# Altium PCB soundbox.PcbDoc
Units mil, origin at the board's own origin, x right, y up, seen from the top; angles counter-clockwise.
Board outline 3320 x 2560 mil, 2 copper layers (Top Layer, Bottom Layer); 39 components, 38 nets, 214 pads, 25 vias.
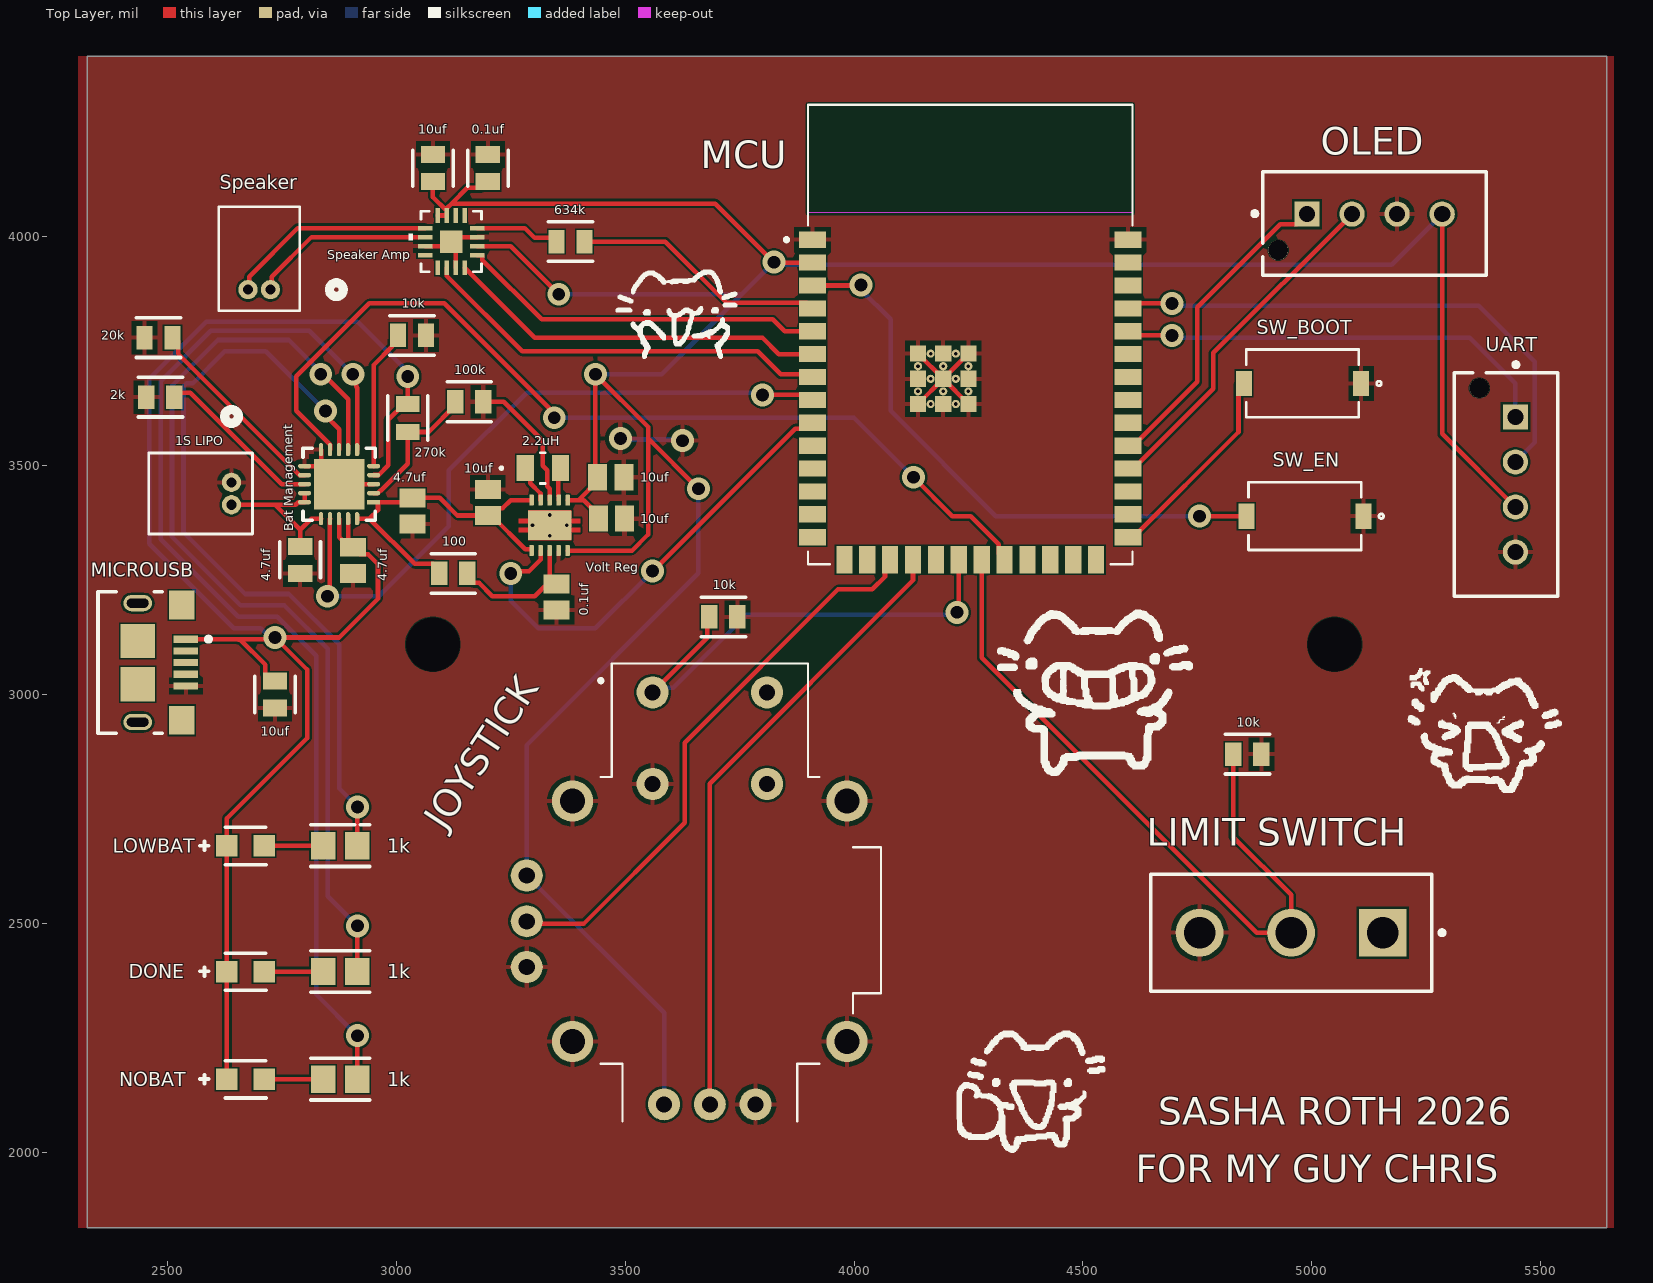
[diagram p0: Top Layer view]
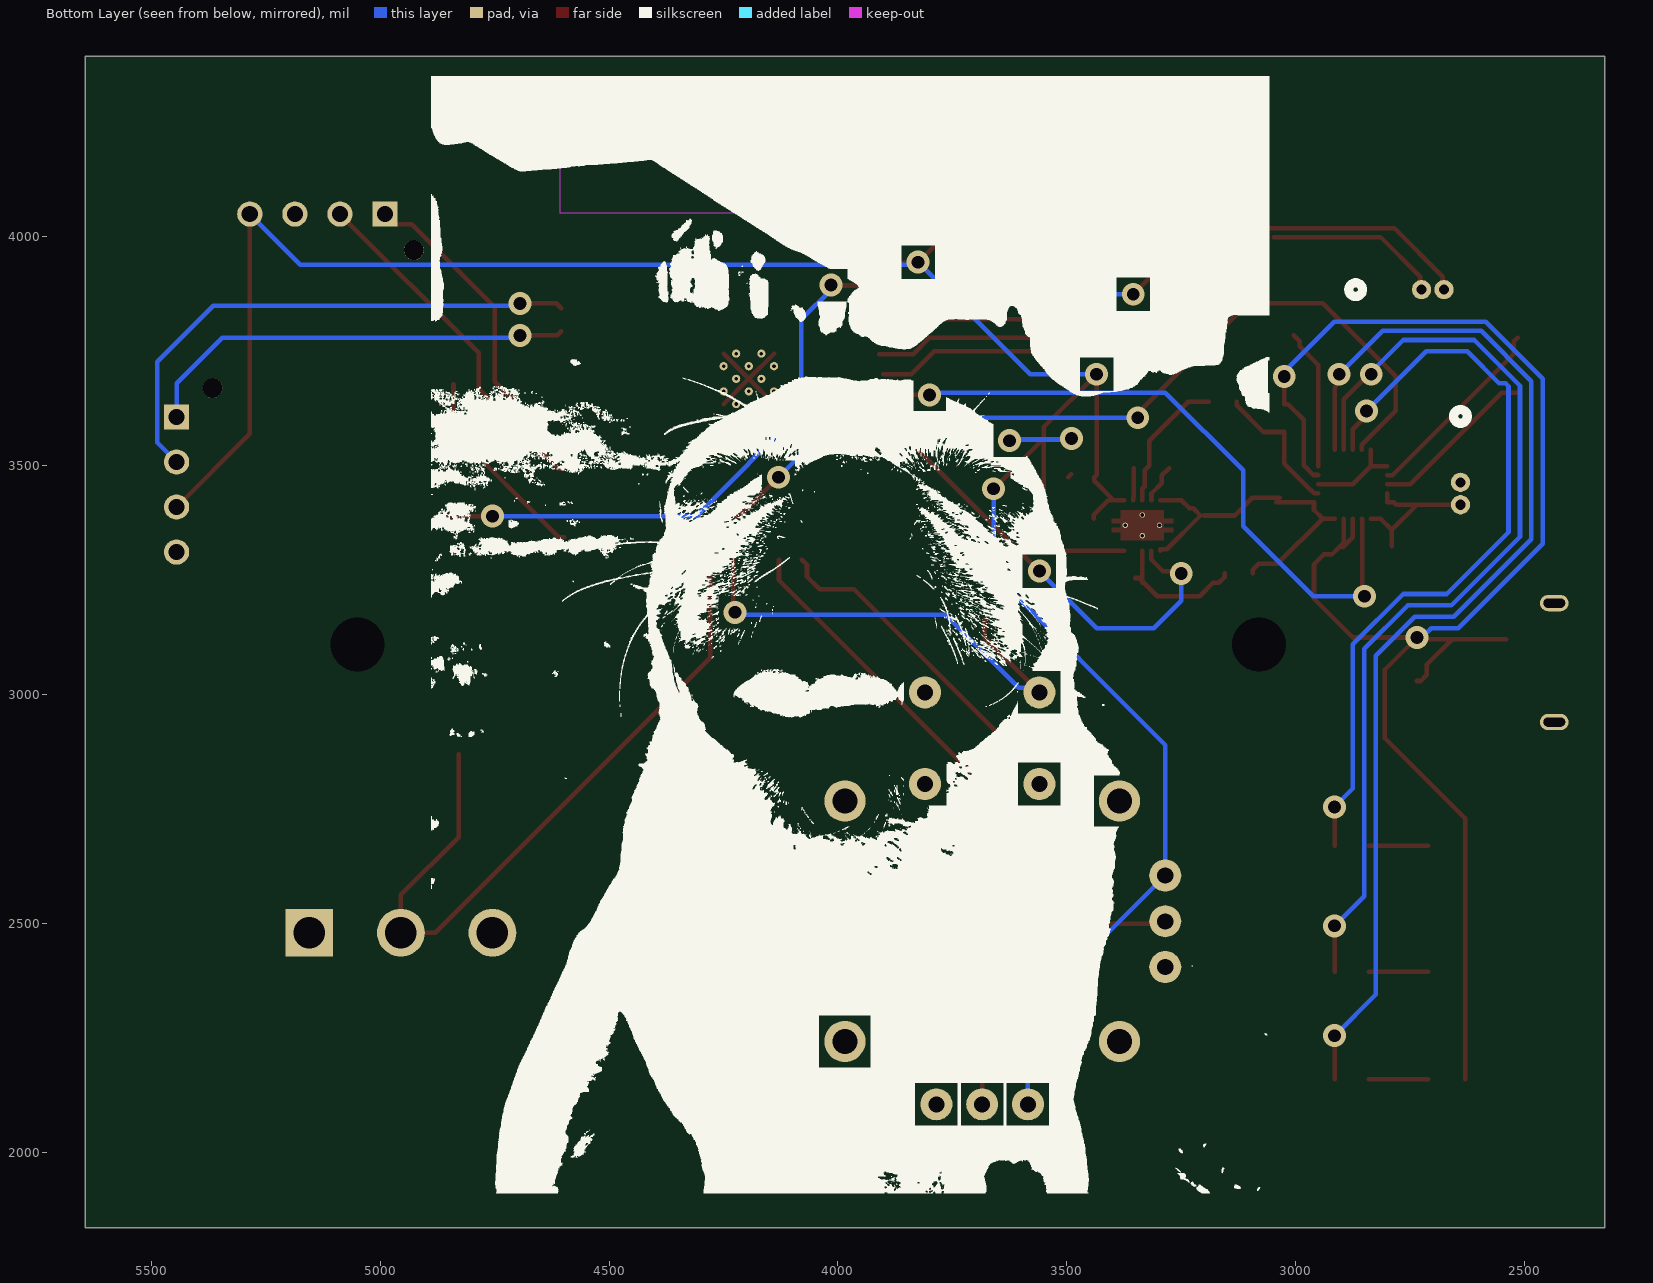
[diagram p1: Bottom Layer view, seen from below]
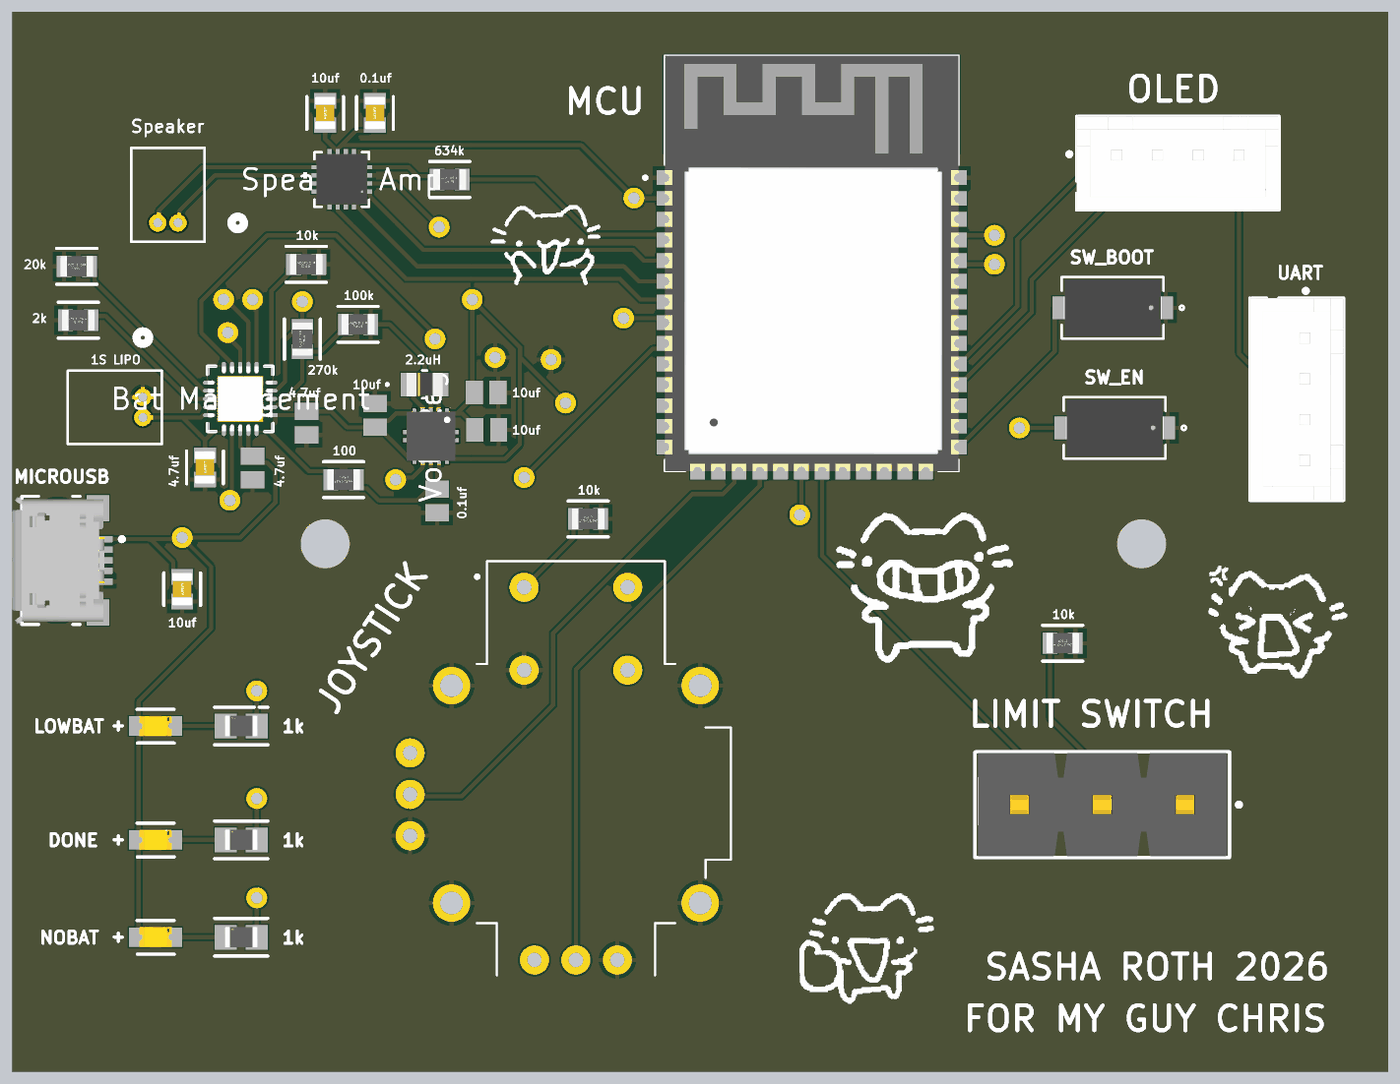
[diagram p2: 3D render of the assembled board from above, using the file's embedded part models]

## Layer stack, top to bottom
Top Solder: solder mask 0.4, Solder Resist, Dk 3.5
Top Layer: signal copper 1.4
Dielectric 1: dielectric 12.6, FR-4, Dk 4.8
Bottom Layer: signal copper 1.4
Bottom Solder: solder mask 0.4, Solder Resist, Dk 3.5

## Board outline
2325,1835 2325,4395 5645,4395 5645,1835

## Design rules (kind name [scope] priority, off if disabled: settings)
Clearance [All] p1: gap=1 ignorepadtopadclearanceinfootprint=FALSE except(3: SMDPad-Fill SMDPad-Poly SMDPad-Region; 5: Arc-Fill Arc-Poly Arc-Region Track-Fill Track-Poly Track-Region THPad-Fill THPad-Poly THPad-Region Via-Fill Via-Poly Via-Region Fill-Fill Fill-Poly Fill-Region Poly-Poly Poly-Region Region-Region)
HoleSize [All] p1: absolutevalues=TRUE maxlimit=120 minlimit=7.87 maxpercent=80.000 minpercent=20.000
MinimumSolderMaskSliver [All] p1: minsoldermaskwidth=3
PolygonConnect [All] p1: connectstyle=Relief reliefconductorwidth=10 reliefentries=4 polygonreliefangle="90 Angle" airgapwidth=10
RoutingVias [All] p1: holewidth=28 width=50 viastyle="Through Hole" minholewidth=28 minwidth=50 maxholewidth=28 maxwidth=50
SolderMaskExpansion [All] p1: expansion=0 istentingtop=FALSE
SupplyNets "Schematic Supply Nets_3" [InNet('3.3V')] p1: voltage=0.000
SupplyNets "Schematic Supply Nets_2" [InNet('BAT_OUT')] p2: voltage=0.000
SupplyNets "Schematic Supply Nets_1" [InNet('USB')] p3: voltage=0.000
SupplyNets "Schematic Supply Nets" [InNet('GND')] p4: voltage=0.000
Width [All] p1: maxlimit=10 minlimit=10 preferedwidth=10
28 further rules are at their usual default settings.

## Classes and differential pairs
component class soundbox: 0.1uf 1k "1S LIPO" 2.2uH 2k 4.7uf 10k 10uf 20k 100 100k 270k 634k "Bat Management" DONE JOYSTICK "Limit Switch" LOWBAT MCU MicroUSB NOBAT OLED Speaker "Speaker Amp" SW_BOOT SW_EN UART "Volt Reg"

## Components (designator, comment, footprint, x,y, rotation, side; value= is the part's Value field where it differs from the comment)
0.1uf "0.1uf" FP-C0805C106K8RACAUTO-MFG 3200,4150.47 r90 top (schematic designator C10)
0.1uf "0.1uf" CAPC2014X150X70LL20 3350,3213.54 r90 top (schematic designator C5)
1k "1k" FP-TFCR0805-IPC_A 2877.45,2160 r0 top (schematic designator R3)
1k "1k" FP-TFCR0805-IPC_A 2877.45,2395 r0 top (schematic designator R2)
1k "1k" FP-TFCR0805-IPC_A 2877.45,2670 r0 top (schematic designator R1)
"1S LIPO" "530480210" CONN02_530480210_MOL 2640,3464 r270 top (schematic designator "Bat Connection")
2.2uH "2.2uH" IND_2012_TDK 3320,3495 r0 top (schematic designator L1)
2k "2k (1C)" FP-CRGCQ0805-IPC_C 2484.45,3650 r180 top value=100KΩ (schematic designator R7)
4.7uf "4.7uf" CAPC2014X150X70LL20 2905,3293.54 r90 top (schematic designator C3)
4.7uf "4.7uf" FP-C0805C106K8RACAUTO-MFG 2790,3294.53 r270 top (schematic designator C2)
4.7uf "4.7uf" CAPC2014X150X70LL20 3035,3401.46 r270 top (schematic designator C1)
10k "10k" FP-CRGCQ0805-IPC_C 3714.45,3170 r0 top value=100KΩ (schematic designator R11)
10k "10k" FP-CRGCQ0805-IPC_C 4859.45,2870 r0 top value=100KΩ (schematic designator R10)
10k "10k" FP-CRGCQ0805-IPC_C 3034.45,3785 r180 top value=100KΩ (schematic designator R6)
10uf "10uf" FP-C0805C106K8RACAUTO-MFG 3080,4150.47 r90 top (schematic designator C9)
10uf "10uf" FP-C0805C106K8RACAUTO-MFG 2735,3000.47 r270 top (schematic designator C8)
10uf "10uf" CAPC2014X150X70LL20 3468.54,3475 r180 top (schematic designator C7)
10uf "10uf" CAPC2014X150X70LL20 3470,3385 r180 top (schematic designator C6)
10uf "10uf" CAPC2014X150X70LL20 3200,3420 r270 top (schematic designator C4)
20k "20k" FP-CRGCQ0805-IPC_C 2480.55,3780 r180 top value=100KΩ (schematic designator R8)
100 "100" FP-CRGCQ0805-IPC_C 3124.45,3265 r0 top value=100KΩ (schematic designator R9)
100k "100k" FP-CRGCQ0805-IPC_C 3159.45,3640 r180 top value=100KΩ (schematic designator R5)
270k "270k" FP-CRGP0805-IPC_C 3025,3604.45 r270 top value=270KΩ (schematic designator R4)
634k "634k" FP-CRGCQ0805-IPC_C 3380.55,3990 r180 top value=100KΩ (schematic designator R12)
"Bat Management" "MCP73871T-2CCI/ML" FP-C04-126-IPC_C 2875,3460 r180 top
DONE "done" FP-SM0805YCL-MFG 2670.5,2395 r0 top (schematic designator D2)
JOYSTICK "COM-09032" XDCR_COM-09032 3685,2505 r0 top
"LIMIT SWITCH" "5.08mm" FP-HPM-03-01-T-S-MFG 4955,2480 r180 top (schematic designator "Limit Switch")
LOWBAT "lowbat" FP-SM0805YCL-MFG 2670.5,2670 r0 top (schematic designator D1)
MCU "ESP32-S3-WROOM-1-N8R2" XCVR_ESP32-S3-WROOM-1-N8R2 4253.94,3786.97 r0 top
MICROUSB "10118193-0001LF" FCI-10118193-0001LF-5_V 2488.15,3070.08 r270 top (schematic designator MicroUSB)
NOBAT "nobat" FP-SM0805YCL-MFG 2670.5,2160 r0 top (schematic designator D3)
OLED "2.54mm" FP-B4B-XH-AM_LF_SN-MFG 5137.36,4029.33 r180 top
Speaker "8ohm 1W" CONN02_530480210_MOL 2725,3885 r180 top
"Speaker Amp" "MAX98357AETE+T" 21-0136I_T1633-4_MXM 3120,3990 r180 top
SW_BOOT "PTS636SL43SMTRLFS" SW_PTS636S-J_CNK 4980,3680 r180 top
SW_EN "PTS636SL43SMTRLFS" SW_PTS636S-J_CNK 4985,3390 r180 top
UART "2.54mm" FP-B4B-XH-AM_LF_SN-MFG 5424.33,3459.21 r90 top
"Volt Reg" "TPS63001DRCR" VREG_V62/16624-01YE 3335,3370 r270 top

## Footprints (in the part's own frame and the unit in brackets; to place one, negate y for a bottom-side part, rotate by r counter-clockwise, add the part's x,y. Pads: shape width x height; smd on the part's side, far side on the other; paste and mask are expansions set on the pad)
21-0136I_T1633-4_MXM [mil]
  rect 32x10 smd paste+0 mask+0: 1(-57,29.53) 2(-57,9.84) 3(-57,-9.84) 4(-57,-29.53) 9(57,-29.53) 10(57,-9.84) 11(57,9.84) 12(57,29.53)
  rect 10x32 smd paste+0 mask+0: 5(-29.53,-57) 6(-9.84,-57) 7(9.84,-57) 8(29.53,-57) 13(29.53,57) 14(9.84,57) 15(-9.84,57) 16(-29.53,57)
  rect 49x49 smd paste+0 mask+0: 17(0,0)
  silkscreen extent -66,-66 93,66, body extent -61,-61 61,61, height 32
CAPC2014X150X70LL20 [mm] "Chip Capacitor, 2-Leads, Body 2.00x1.35mm, IPC High Density"
  rect 1.05x1.45 smd: 1(-0.725,0) 2(0.725,0)
  body extent -1.1,-0.77 1.1,0.77, height 1.5
CONN02_530480210_MOL [mil]
  round 42 hole 22 mask+4.02: 1(0,0) 2(49,0)
  silkscreen extent -159,-181 113,46
FCI-10118193-0001LF-5_V [mm] "Micro, USB-B, 5-Leads, Body 7.86x5.05mm, Pitch 0.65 mm"
  rect 0.4x1.35 smd: 1(-1.3,1.325) 2(-0.65,1.325) 3(0,1.325) 4(0.65,1.325) 5(1.3,1.325)
  rect 1.6x1.4 smd: 6(-3.2,1.1) 7(3.2,1.1)
  rect 1.9x1.9 smd: 8(-1.2,-1.35) 9(1.2,-1.35)
  oval 0.9x1.6 hole 0.5 slot 1.2 at 90 deg: 10(-3.3,-1.35) 11(3.3,-1.35)
  silkscreen extent -3.93,-3.55 3.93,2.7, body extent -3.93,-4.16 3.93,1.5, height 2.83
FP-B4B-XH-AM_LF_SN-MFG [mm]
  rect 1.4x1.4 hole 0.9 paste-2539.97 mask+0: 1(3.75,-0.525)
  round 1.4 hole 0.9 paste-2539.97 mask+0: 2(1.25,-0.525) 3(-1.25,-0.525) 4(-3.75,-0.525)
  round 1.1 hole 1.1 unplated paste-2539.97 mask+0: ""(5.35,1.475)
  silkscreen extent -6.2,-2.88 6.77,2.88, body extent -6.3,-2.98 6.3,2.98, height 0.25
FP-C04-126-IPC_C [mm]
  rect 0.729x0.239 smd paste+0 mask+0: 1(-1.915,1)
  rrect100% 0.729x0.239 smd paste+0 mask+0: 2(-1.915,0.5) 3(-1.915,0) 4(-1.915,-0.5) 5(-1.915,-1) 11(1.915,-1) 12(1.915,-0.5) 13(1.915,0) 14(1.915,0.5) 15(1.915,1)
  rrect100% 0.239x0.729 smd paste+0 mask+0: 6(-1,-1.915) 7(-0.5,-1.915) 8(0,-1.915) 9(0.5,-1.915) 10(1,-1.915) 16(1,1.915) 17(0.5,1.915) 18(0,1.915) 19(-0.5,1.915) 20(-1,1.915)
  rect 2.8x2.8 smd paste-1000 mask+0: 21(0,0)
  silkscreen extent -2,-2 2,2, body extent -2.38,-2.38 2.38,2.38, height 0.25
FP-C0805C106K8RACAUTO-MFG [mm]
  rect 0.95x1.35 smd paste+0 mask+0: 1(-0.75,0) 2(0.75,0)
  silkscreen extent -1,-1.12 1,1.12, body extent -1.4,-0.85 1.4,0.85, height 0.25
FP-CRGCQ0805-IPC_C [mil]
  rect 35.67x51.57 smd paste+0 mask+0: 1(-30.55,0) 2(30.55,0)
  silkscreen extent -48,-43 48,43, body extent -52,-31 52,31, height 10
FP-CRGP0805-IPC_C [mil]
  rect 35.67x51.57 smd paste+0 mask+0: 1(-30.55,0) 2(30.55,0)
  silkscreen extent -48,-43 48,43, body extent -52,-31 52,31, height 10
FP-HPM-03-01-T-S-MFG [mm]
  rect 2.65x2.65 hole 1.75 paste-2539.97 mask+0: 1(-5.08,0)
  round 2.65 hole 1.75 paste-2539.97 mask+0: 2(0,0) 3(5.08,0)
  silkscreen extent -8.5,-3.24 7.8,3.24, body extent -7.9,-3.34 7.9,3.34, height 0.25
FP-SM0805YCL-MFG [mil]
  rect 47x47 smd paste+0 mask+0: 1(-40.5,0) 2(40.5,0)
  silkscreen extent -100,-41 45,40, body extent -68,-33 68,33, height 10
FP-TFCR0805-IPC_A [mil]
  rect 53.38x59.38 smd paste+0 mask+0: 1(-37.45,0) 2(37.45,0)
  silkscreen extent -64,-45 64,45, body extent -84,-49 84,49, height 10
IND_2012_TDK [mm]
  rect 0.956x1.45 smd paste+0 mask+0: 1(-0.978,0) 2(0.978,0)
  silkscreen extent -2.37,-0.85 0.14,0.85, body extent -1.1,-0.72 1.1,0.72, height 1.1
SW_PTS636S-J_CNK [mil]
  rect 35x55 smd paste+0 mask+0: 1(-127.95,0) 2(127.95,0)
  silkscreen extent -172,-74 123,74, body extent -118,-69 118,69, height 159
VREG_V62/16624-01YE [mm]
  rrect25% 0.6x0.24 smd mask+0: 1(-1.4,1) 2(-1.4,0.5) 3(-1.4,0) 4(-1.4,-0.5) 5(-1.4,-1) 6(1.4,-1) 7(1.4,-0.5) 8(1.4,0) 9(1.4,0.5) 10(1.4,1)
  rrect5% 1.65x2.4 smd paste-2 mask+0: 11(0,0)
  round 0.3 hole 0.2 mask+0: 12(0,-0.95) 13(-0.575,0) 14(0.575,0) 15(0,0.95)
  Top Layer region: 0.375,1.2 0.825,1.2 0.825,-1.2 0.375,-1.2 0.375,-1.7 0.125,-1.7 0.125,-1.2 -0.125,-1.2 -0.125,-1.7 -0.375,-1.7 -0.375,-1.2 -0.825,-1.2 -0.825,1.2 -0.375,1.2 -0.375,1.7 -0.125,1.7 -0.125,1.2 0.125,1.2 0.125,1.7 0.375,1.7
  body extent -1.5,-1.5 1.5,1.5, height 1
XCVR_ESP32-S3-WROOM-1-N8R2 [mm]
  rect 1.5x0.9 smd: 1(-8.75,5.26) 2(-8.75,3.99) 3(-8.75,2.72) 4(-8.75,1.45) 5(-8.75,0.18) 6(-8.75,-1.09) 7(-8.75,-2.36) 8(-8.75,-3.63) 9(-8.75,-4.9) 10(-8.75,-6.17) 11(-8.75,-7.44) 12(-8.75,-8.71) 13(-8.75,-9.98) 14(-8.75,-11.25) 27(8.75,-11.25) 28(8.75,-9.98) 29(8.75,-8.71) 30(8.75,-7.44) 31(8.75,-6.17) 32(8.75,-4.9) 33(8.75,-3.63) 34(8.75,-2.36) 35(8.75,-1.09) 36(8.75,0.18) 37(8.75,1.45) 38(8.75,2.72) 39(8.75,3.99) 40(8.75,5.26)
  rect 0.9x1.5 smd: 15(-6.985,-12.5) 16(-5.715,-12.5) 17(-4.445,-12.5) 18(-3.175,-12.5) 19(-1.905,-12.5) 20(-0.635,-12.5) 21(0.635,-12.5) 22(1.905,-12.5) 23(3.175,-12.5) 24(4.445,-12.5) 25(5.715,-12.5) 26(6.985,-12.5)
  rect 0.9x0.9 smd: 41_1(-1.5,-2.46) 41_2(-2.9,-2.46) 41_3(-0.1,-2.46) 41_4(-2.9,-3.86) 41_5(-1.5,-3.86) 41_6(-0.1,-3.86) 41_7(-2.9,-1.06) 41_8(-1.5,-1.06) 41_9(-0.1,-1.06)
  round 0.455 hole 0.2 mask+0: 41_10(-1.5,-1.76) 41_11(-2.9,-1.76) 41_12(-0.1,-1.76) 41_13(-2.9,-3.16) 41_14(-1.5,-3.16) 41_15(-0.1,-3.16) 41_16(-2.2,-1.06) 41_17(-0.8,-1.06) 41_18(-2.2,-2.46) 41_19(-0.8,-2.46) 41_20(-2.2,-3.86) 41_21(-0.8,-3.86)
  Keep-Out Layer region: 9,6.75 -9,6.75 -9,12.75 9,12.75
  Keep-Out Layer region: 9,6.75 -9,6.75 -9,12.75 9,12.75
  silkscreen extent -10.3,-12.75 9,12.75, body extent -9,-12.75 9,12.75, height 3.25
XDCR_COM-09032 [mil]
  round 70 hole 35.43: B1A(-125,500) B1B(125,500) B2A(-125,300) B2B(125,300)
  round 70 hole 35: H1(-100,-400) H2(0,-400) H3(100,-400) V1(-400,100) V2(-400,0) V3(-400,-100)
  round 90 hole 55: S1(-300,262.5) S2(-300,-262.5) S3(300,-262.5) S4(300,262.5)
  silkscreen extent -242,-437 374,563

## Part data
0.1uf 4.7uf 10uf 10uf: library part CMP-03020-034662-1, "CAP CER 10UF 10V X7R 0805", Capacitance=10uF, Case Code (Imperial)=0805, Case Code (Metric)=2012, Max Operating Temperature=125°C, Min Operating Temperature=-55°C, Ratings=AEC-Q200, Tolerance=10%, Voltage Rating=10V, Case/Package=0805, Mount="Surface Mount", Packaging="Tape and Reel", RoHS Compliant=Yes
0.1uf 4.7uf 4.7uf 10uf 10uf 10uf: library part CMP-2007-00040-1, Manufacturer="AVX Interconnect / Elco", Part Number=TACR475M020XTA
1k 1k 1k: library part CMP-250906-148809-1, "RES Thin Film,  1kΩ, 0.1%, 0.1W, 25ppm/°C, 0805"
"1S LIPO" Speaker: library part CMP-017-000001-1, "Conn Shrouded Header (4 Sides) HDR 2 POS 1.25mm Solder RA Side Entry Thru-Hole PicoBladeâ„¢ Tray", Package=None, Check_prices=https://www.snapeda.com/parts/530480210/Molex/view-part/?ref=eda, Component Type=Standard, Design Item ID=530480210, MF=Molex, MP=530480210, Pin Count=2, SnapEDA_Link=https://www.snapeda.com/parts/530480210/Molex/view-part/?ref=snap, Source=530480210.SchLib
2.2uH: library part CMP-036-000000-1, "INDUCTOR; SMT (0805); FERRITE; 2.2UH; 20%; 1A", Manufacturer_Name=TDK, Manufacturer_Part_Number=MLP2012H2R2MT0S1, Copyright="Copyright (C) 2025 Ultra Librarian. All rights reserved.", Design Item ID=MLP2012H2R2MT0S1, Source=MLP2012H2R2MT0S1.SchLib
2k 10k 10k 10k 20k 100 100k 634k: library part CMP-03211-009742-1, "CRGCQ0805 100KΩ 0.125W ±100ppm/°C 5% 150V", Ambient Temperature Range High=+70°C, Manufacturer="TE Connectivity", Manufacturer Part Number=CRGCQ0805J100K, Package=CRGCQ0805, Power Rating=0.125W, Resistance=100KΩ, Temperature="-55°C to +155°C", Temperature Coefficient=±100ppm/°C, Temperature Range High=+155°C, Temperature Range Low=-55°C, Tolerance=0.05, Voltage Rating=150V, Automotive=Yes, Automotive Grade="Grade 1142", Category=Res, ComponentLink2Description=Datasheet, ComponentLink2URL=https://www.te.com/commerce/DocumentDelivery/DDEController?Action=showdoc&DocId=Data+Sheet%7F1773204-3%7F1%7Fpdf%7FEnglish%7FENG_DS_1773204-3_1.pdf%7F4-2176341-1151, Composition="Thick Film", Device Class L1="Passive Components", Device Class L2=Resistors, Device Class L3="Chip SMD Resistors", Height=0.65mm, Ipc Land Pattern Name=RESC200125X55, Lead Free=Yes, Octopart=https://octopart.com/crgcq0805j100k-te+connectivity-91018199, RoHS=TRUE, Series=CRGCQ
270k: library part CMP-03211-000264-1, "CRGP0805 270KΩ 0.33W ±100ppm/°C 1% 150V", Ambient Temperature Range High=+70°C, Manufacturer=TE, Manufacturer Part Number=CRGP0805F270K, Package=CRGP0805, Power Rating=0.33W, Resistance=270KΩ, Temperature="-55°C to +155°C", Temperature Coefficient=±100ppm/°C, Temperature Range High=+155°C, Temperature Range Low=-55°C, Tolerance=0.01, Voltage Rating=150V, Automotive=No, Category=Res, ComponentLink2Description=Datasheet, ComponentLink2URL=https://www.mouser.com/datasheet/2/418/NG_DS_9-1773463-9_A-1358566.pdf, Composition="Thick Film", Device Class L1="Passive Components", Device Class L2=Resistors, Device Class L3="Chip SMD Resistors", Height=0.65mm, Ipc Land Pattern Name=RESC200125X55, Lead Free=Yes, Octopart=https://octopart.com/crgp0805f270k-te+connectivity-91018805, RoHS=TRUE, Series=CRGP
"Bat Management": library part CMP-06318-000014-1, "IC USB/AC BATT CHRGR W/PPM 20QFN", Case/Package=QFN, Max Operating Temperature=85°C, Max Supply Voltage=6V, Min Operating Temperature=-40°C, Min Supply Voltage=4.5V, Output Current=1A, Output Voltage=4.2V, Package Quantity=3300, Contact Plating=Tin, Lead Free="Lead Free", Mount="Surface Mount", Number of Pins=20, Packaging="Tape and Reel", RoHS Compliant=Yes
DONE LOWBAT NOBAT: library part CMP-35283-000007-1, "LED YELLOW CLEAR 0805 SMD", Case Code (Imperial)=0805, Case Code (Metric)=2012, Color=Yellow, Forward Current=2mA, Forward Voltage=1.9V, Lens Color=Colorless, Max Operating Temperature=80°C, Min Operating Temperature=-30°C, Package Quantity=4000, Case/Package=0805, Dominant Wavelength=592nm, Height=0.8mm, Illumination Color=Yellow, Lead Free="Lead Free", Length=2mm, Lens Transparency=Clear, Luminous Intensity=11.5mcd, Mount="Surface Mount", Packaging="Tape and Reel", Test Current=2mA, Viewing Angle=130°, Width=1.2mm
JOYSTICK: library part CMP-038-000000-1, "Thumb Joystick", Package=None, Availability=Unavailable, Component Type=Standard, Design Item ID=COM-09032, MP=COM-09032, Pin Count=12, Price=None, Source=COM-09032.SchLib
"LIMIT SWITCH": library part CMP-02766-001446-1, "CONN HEADER VERT 3POS 5.08MM", Max Operating Temperature=105°C, Min Operating Temperature=-55°C, Contact Material="Copper Alloy", Contact Plating=Tin, Depth=6.35mm, Gender=Male, Housing Material=Polyester, Length=15.24mm, Number of Contacts=3, Number of Rows=1, Orientation=Straight, Packaging=Bulk, Pitch=5.08mm, Radiation Hardening=No, REACH SVHC="No SVHC", Series=HPM, Termination=Solder
MCU: library part CMP-028-000000-1, "WiFi 802.11a/b/g/n, Bluetooth v5.0 Transceiver Module 2.4GHz Antenna Not Included -", Package="- Espressif Systems", Availability="In Stock", Check_prices=https://www.snapeda.com/parts/ESP32-S3-WROOM-1-N8R2/Espressif+Systems/view-part/?ref=eda, Component Type=Standard, Design Item ID=ESP32-S3-WROOM-1-N8R2, MF="Espressif Systems", MP=ESP32-S3-WROOM-1-N8R2, Pin Count=49, Price=None, Purchase-URL=https://pricing.snapeda.com/search?q=ESP32-S3-WROOM-1-N8R2&ref=eda, SnapEDA_Link=https://www.snapeda.com/parts/ESP32-S3-WROOM-1-N8R2/Espressif+Systems/view-part/?ref=snap, Source=ESP32-S3-WROOM-1-N8R2.SchLib
MICROUSB: library part CMP-2000-05119-1, "Micro USB B Type Receptacle, -55 to 85 degC, 5-Pin SMD, RoHS, Tape and Reel", Color=Black, Current Rating=1.8A, Flammability Rating=UL94V-0, Insulation Resistance=1000MOhms, Manufacturer=FCI, Operating Temperature Range=-55Cto+85C, Brand=FCI, Connector Type=MicroUSBTypeBreceptacle, Contact Material=CopperAlloy, Contact Plating=Gold, Datasheet URL=http://datasheet.octopart.com/10118193-0001LF-FCI-datasheet-55953155.pdf, Datasheet Version="Rev. C, 05/2015", Factory Pack Quantity=1200, Gender=Female, Manufacturer URL=http://www.fci.com/, Mounting Angle=Right, Number of Contacts=5Contact, Packaging=Reel, Product=MicroUSBTypeBConnectors, Product Category=USBConnectors, RoHS=Details, Standard=USB2.0, Termination Style=SMD/SMT
OLED UART: library part CMP-17439-000117-1, "CONN HEADER VERT 4POS 2.5MM", Color=Green, Contact Resistance=20mR, Flammability Rating="UL94 V-0", Housing Color=White, Insulation Color=Natural, Max Current Rating=3A, Max Operating Temperature=85°C, Max Voltage Rating (AC)=250V, Min Operating Temperature=-25°C, Connector Type=Header, Contact Finish - Mating=TIN, Contact Material=Brass, Contact Plating=Copper, Contact Shape=Square, Contact Type="Male Pin", Depth=5.75mm, Fastening Type=Detent, Gender=Male, Housing Material=Polyamide, Insulation Material=Nylon, Lead Free="Lead Free", Length=12.4mm, Mated Stacking Heights=9.8mm, Mount="Through Hole", Number of Pins=4, Number of Positions=4, Number of Rows=1, Orientation=Straight, Packaging=Bulk, Pitch=2.5mm, Series=XH, Termination=Solder, Voltage Rating=250V
"Speaker Amp": library part CMP-026-000000-1, "Tiny, Low-Cost, PCM Class D Amplifier with Class AB Performance", Manufacturer_Name="Analog Devices Inc", Copyright="Copyright (C) 2026 Ultra Librarian. All rights reserved.", Design Item ID=MAX98357AETE+T, Manufacturer_Part_Number=MAX98357AETE+T, RefDes=RefDes, Source=MAX98357AETE&plus_T.SchLib, Type=Type
SW_BOOT SW_EN: library part CMP-019-000001-1, "Description", Manufacturer_Name="C&K Components", Copyright="Copyright (C) 2026 Ultra Librarian. All rights reserved.", Design Item ID=PTS636SL43SMTRLFS, Manufacturer_Part_Number=PTS636SL43SMTRLFS, Source=PTS636SL43SMTRLFS.SchLib, Type="Tactile Switches"
"Volt Reg": library part CMP-005-000002-1, "96% Buck-Boost Converter with 1.7A Current Switches, 3.3V fixed Output voltage in 3x3 QFN", Package="VSON-10 Texas Instruments", Check_prices=https://www.snapeda.com/parts/TPS63001DRCR/Texas+Instruments/view-part/?ref=eda, Component Type=Standard, Design Item ID=TPS63001DRCR, MF="Texas Instruments", MP=TPS63001DRCR, Pin Count=11, SnapEDA_Link=https://www.snapeda.com/parts/TPS63001DRCR/Texas+Instruments/view-part/?ref=snap, Source=TPS63001DRCR.SchLib

## Free pads (board coordinates)
  round 0 hole 118.11: 3(3080,3110) 4(5050,3110)

## Via types
v1: diameter 50, hole 28, Top Layer to Bottom Layer, 25 vias

## Nets (pads, with @x,y where several pads share a name; then routed paths per layer and width w, separated by ;. In a path a pad name is that pad's centre, name@x,y a point inside that pad or via, vN(x,y) a via of type N, cw(c..) or ccw(c..) an arc to the next point about the centre after c; other vN are vias at no path point)
3.3V: 0.1uf.1@3200,4120.94 10uf.1@3080,4120.94 10uf.2@3440,3475 10uf.2@3441.46,3385 "Speaker Amp.2" "Speaker Amp.7" "Speaker Amp.8" "Volt Reg.1" "Volt Reg.10" JOYSTICK.H1 JOYSTICK.V1 MCU.2 OLED.4 UART.3 | length 7134.7
  Top Layer w10: 10uf.1@3080,4120.94 3080,4087.24 3109.24,4058 3110.16,4058 ; 3090.47,4047 3110.16,4047 3110.16,4058 ; 3177,3980.16 3249.84,3980.16 v1(3355,3875) ; 0.1uf.1@3200,4120.94 3186.3,4107.24 3154.94,4107.24 3120.7,4073 ; 3374.37,3314.88 3514.88,3314.88 3550,3350 3550,3559.79 ; 3374.37,3425.12 3397.99,3425.12 ; 10uf.2@3441.46,3385 3441.46,3392.87 3409.21,3425.12 3397.99,3425.12 ; v1(3660,3450) 3550.21,3559.79 3550.21,3584.79 v1(3435,3700) 3435,3480 3440,3475 3440,3467.13 3397.99,3425.12 ; v1(3825,3945) 3697,4073 3120.7,4073 ; v1@3835,3944.06 MCU.2 ; OLED.4 5285,3570 UART.3 ; 3110.16,4058 3110.16,4062.46 3120.7,4073
  Bottom Layer w10: v1(3355,3875) 3755,3875 ; v1(3435,3700) 3580,3700 3755,3875 ; JOYSTICK.H1 3585,2305 JOYSTICK.V1 3285,2890 3660,3265 v1(3660,3450) ; OLED.4 5174.61,3939.61 3830.39,3939.61 v1(3825,3945) 3755,3875
AMP_DIN: "Speaker Amp.1" MCU.5 | length 807.8
  Top Layer w10: 3177,3960.47 3188,3960.47 3188,3949.47 3317.47,3820 3822.66,3820 3848.61,3794.06 MCU.5
AMP_SD: 634k.1 MCU.4 | length 558.8
  Top Layer w10: 634k.1 3587.82,3990 3721.05,3856.77 3896.73,3856.77 MCU.4
BAT_OUT: 4.7uf.1@3035,3430 10uf.2@3200,3391.46 100.1 "Bat Management.1" "Bat Management.20" "Volt Reg.5" "Volt Reg.6" | length 763.2
  Top Layer w10: 2914.37,3384.62 2941.07,3384.62 ; 4.7uf.1@3035,3430 3095,3430 3133.54,3391.46 10uf.2@3200,3391.46 ; 4.7uf.1@3042.09,3420.63 2960.29,3420.63 2960,3420.34 2960,3403.55 2941.07,3384.62 ; 100.1 3093.89,3272.95 3081.06,3285.78 3039.91,3285.78 2941.07,3384.62 ; 3295.63,3314.88 3295.63,3317.57 3295.35,3317.84 3281.49,3317.84 3207.87,3391.46 3223.54,3407.13 3232.13,3407.13 3250.12,3425.12 3295.63,3425.12
BCLK: "Speaker Amp.16" MCU.6 | length 838.2
  Top Layer w10: 3149.53,3933 3302.53,3780 3800,3780 3835.94,3744.06 MCU.6
BUTTON: 10k.1@4828.89,2870 "LIMIT SWITCH.2" MCU.21 | length 1592.4
  Top Layer w10: MCU.21 4278.94,3081.06 4880,2480 4927.61,2480 4941.31,2466.31 4955,2480 4955,2562.78 4828.89,2688.89 10k.1@4828.89,2870
CHARGE_EN: "Bat Management.17" MCU.8 | length 1493.6
  Top Layer w10: v1(2850,3215) 2855.03,3220.03 2855.03,3384.33 2855.31,3384.62 ; v1(3800,3655) 3898.5,3655 MCU.8
  Bottom Layer w10: v1(2850,3215) 2961.94,3215 3115,3368.06 3115,3490 3285,3660 3795,3660 v1(3800,3655)
GND: 0.1uf.1@3350,3185 0.1uf.2@3200,4180 2k.2 4.7uf.1@2905,3265 4.7uf.2@2790,3265 4.7uf.2@3035,3372.91 10k.1@3065,3785 10k.2@3745,3170 10k.2@4890,2870 10uf.1@3200,3448.54 10uf.1@3497.09,3475 10uf.1@3498.54,3385 10uf.2@2735,2970.94 10uf.2@3080,4180 20k.2 100k.1 "1S LIPO.1" "Bat Management.3" "Bat Management.10" "Bat Management.11" "Bat Management.21" "LIMIT SWITCH.3" "Speaker Amp.3" "Speaker Amp.11" "Speaker Amp.15" "Speaker Amp.17" "Volt Reg.3" "Volt Reg.9" JOYSTICK.B2A JOYSTICK.H3 JOYSTICK.S1 JOYSTICK.S2 JOYSTICK.S3 JOYSTICK.S4 JOYSTICK.V3 MCU.1 MCU.40 MCU.41_1 MCU.41_2 MCU.41_3 MCU.41_4 MCU.41_5 MCU.41_6 MCU.41_7 MCU.41_8 MCU.41_9 MICROUSB.5 OLED.3 SW_BOOT.1 SW_EN.1 UART.4 | length 1146.5
  Top Layer w10: 2799.62,3499.37 2835.63,3499.37 ; 2835.63,3535.38 2835.63,3499.37 ; 2950.38,3460 2875,3460 2835.63,3499.37 ; 3063,3980.16 3110.16,3980.16 3120,3990 ; 3129.84,3933 3129.84,3980.16 3120,3990 ; 3177,3999.84 3129.84,3999.84 3120,3990 ; 100k.1 3235,3640 3320,3555 3320,3500 3330,3490 3330,3455 3335,3450 3335,3425.12 ; 10uf.1@3490,3482.09 10uf.1@3497.09,3475 ; MCU.41_4 MCU.41_1 ; MCU.41_7 MCU.41_1 ; MCU.41_6 MCU.41_1 ; MCU.41_9 MCU.41_1
  Bottom Layer w10: v1(3490,3560) 3492.5,3557.5 3622.5,3557.5 v1(3625,3555)
HORZ: JOYSTICK.H2 MCU.18 | length 1393.2
  Top Layer w10: JOYSTICK.H2@3685,2085.57 3685,2805.71 4128.94,3249.65 MCU.18
JOYSTICK_SEL: 10k.1@3683.89,3170 JOYSTICK.B1A MCU.20 | length 1059.3
  Top Layer w10: JOYSTICK.B1A 3679.45,3124.45 10k.1@3679.45,3165 ; v1(4225,3180) 4228.94,3183.94 MCU.20
  Bottom Layer w10: JOYSTICK.B1A@3560,3015 3605,3015 3765,3175 4220,3175 v1(4225,3180)
LRCLK: "Speaker Amp.14" MCU.7 | length 898.4
  Top Layer w10: 3110.16,3933 3110.16,3914.84 3275,3750 3790,3750 3840,3700 MCU.7@3901.44,3700
"NetBat Connection_2": 4.7uf.1@2790,3324.06 "1S LIPO.2" "Bat Management.14" "Bat Management.15" "Bat Management.16" | length 351.2
  Top Layer w10: 2640,3415 2735,3415 ; 4.7uf.1@2790,3324.06 2790,3360 ; 2799.62,3440.32 2799.62,3420.63 2785.63,3420.63 2780,3415 2735,3415 ; 2835.63,3384.62 2814.62,3384.62 2790,3360 ; 2735,3415 2790,3360
"NetBat Management_2": 100k.2 270k.2 "Bat Management.2" | length 306.7
  Top Layer w10: 2950.38,3440.32 2959.44,3440.32 2964.41,3445.29 2966.11,3445.29 3025,3504.18 270k.2 3070.73,3573.89 3128.89,3632.05 100k.2
"NetBat Management_5": 10k.2@3003.89,3785 "Bat Management.5" | length 307.8
  Top Layer w10: 2950.38,3499.37 2950.38,3720.38 2991.06,3761.06 2991.06,3772.16 10k.2@3003.89,3785
"NetBat Management_6": 1k.2@2914.9,2160 "Bat Management.6" | length 2426.4
  Top Layer w10: v1(2905,3700) 2912.65,3692.35 2912.65,3672.35 2914.37,3670.63 2914.37,3535.38 ; 1k.2@2914.9,2160 2914.9,2254.9 v1(2915,2255)
  Bottom Layer w10: v1(2905,3700) 2810,3795 2595,3795 2485,3685 2485,3340 2655,3170 2740,3170 2825,3085 2825,2345 v1(2915,2255)
"NetBat Management_7": 1k.2@2914.9,2395 "Bat Management.7" | length 2096.1
  Top Layer w10: v1(2835,3700) 2840,3700 2894.68,3645.32 2894.68,3535.38 ; 1k.2@2914.9,2395 2914.9,2494.9 v1(2915,2495)
  Bottom Layer w10: v1(2835,3700) 2835,3705 2765,3775 2610,3775 2510,3675 2510,3345 2660,3195 2755,3195 2850,3100 2850,2560 v1(2915,2495)
"NetBat Management_8": 1k.2@2914.9,2670 "Bat Management.8" | length 1702.5
  Top Layer w10: v1(2845,3620) 2845,3610 2875,3580 2875,3535.38 ; 1k.2@2914.9,2670 v1(2914.9,2754.9) v1@2915,2755
  Bottom Layer w10: v1(2845,3620) 2715,3750 2625,3750 2555,3680 2540.86,3680 2535,3674.14 2535,3355 2670,3220 2765,3220 2875,3110 2875,2795 v1@2910,2760
"NetBat Management_12": 20k.1 "Bat Management.12" | length 424.7
  Top Layer w10: 20k.1@2515,3780 2523.17,3771.83 2523.17,3745.07 2788.56,3479.69 2799.62,3479.69
"NetBat Management_13": 2k.1 "Bat Management.13" | length 367.5
  Top Layer w10: 2k.1@2515,3660 2550,3660 2750,3460 2799.62,3460
NetC5_2: 0.1uf.2@3350,3242.09 100.2 "Volt Reg.8" | length 306.8
  Top Layer w10: 100.2 3155,3257.05 3167.84,3244.22 3180.78,3244.22 3210,3215 3302.13,3215 0.1uf.2@3335,3247.87 ; 0.1uf.2@3335,3245 0.1uf.2@3335,3247.87 ; 3335,3314.88 0.1uf.2@3335,3247.87 ; 0.1uf.2@3350,3255 3342.13,3255 0.1uf.2@3335,3247.87
NetD1_2: 1k.1@2840,2670 LOWBAT.2 | length 129
  Top Layer w10: LOWBAT.2 1k.1@2840,2670
NetD2_2: 1k.1@2840,2395 DONE.2 | length 129
  Top Layer w10: DONE.2 1k.1@2840,2395
NetD3_2: 1k.1@2840,2160 NOBAT.2 | length 129
  Top Layer w10: NOBAT.2 1k.1@2840,2160
NetL1_1: 2.2uH.1 "Volt Reg.4" | length 86
  Top Layer w10: 2.2uH.1@3276.5,3495 3292.32,3479.19 3292.32,3462.31 3315.04,3439.59 3315.04,3425.39 3315.32,3425.12
NetL1_2: 2.2uH.2 "Volt Reg.2" | length 70.4
  Top Layer w10: 2.2uH.2@3353.5,3495 3353.5,3432.84 3354.68,3431.65 3354.68,3425.12
NetMCU_3: MCU.3 SW_EN.2 | length 1257.3
  Top Layer w10: MCU.3 4004.06,3894.06 v1@4005,3895 ; v1@4770,3395 4775,3390 SW_EN.2
  Bottom Layer w10: v1(4015,3895) 4015,3885 4080,3820 4080,3620 4310,3390 v1(4755,3390)
NetMCU_27: MCU.27 SW_BOOT.2 | length 441.4
  Top Layer w10: MCU.27 4610.24,3344.06 4840,3573.82 SW_BOOT.2@4840,3678.5
NetR12_2: 634k.2 "Speaker Amp.4" | length 185.2
  Top Layer w10: 3177,4019.53 3280.47,4019.53 3302.05,3997.95 3342.05,3997.95 634k.2
POW_SAVE: "Volt Reg.7" MCU.9 | length 1027.7
  Top Layer w10: v1(3250,3265) 3255,3270 3290,3270 3315.32,3295.32 3315.32,3314.88 ; v1(3560,3270) 3871.34,3581.34 3896.73,3581.34 MCU.9
  Bottom Layer w10: v1(3250,3265) 3250,3205 3310,3145 3435,3145 v1(3560,3270)
RX: MCU.36 UART.1 | length 958.9
  Top Layer w10: MCU.36@4604.49,3794.21 4613.7,3785 v1(4695,3785)
  Bottom Layer w10: v1@4695,3780 5345,3780 5444.39,3680.61 5444.39,3607.46 UART.1
SCL: MCU.30 OLED.2 | length 765.7
  Top Layer w10: MCU.30 4610.24,3494.06 4785,3668.82 4785,3746.85 OLED.2
SDA: MCU.31 OLED.1 | length 696.1
  Top Layer w10: MCU.31 4610.24,3544.06 4750,3683.82 4750,3846.36 4931.08,4027.44 4967.17,4027.44 OLED.1
SPEAKER_N: "Speaker Amp.10" Speaker.1 | length 384.8
  Top Layer w10: Speaker.1 2727.96,3887.96 2727.96,3912.96 2814.84,3999.84 3047.54,3999.84
SPEAKER_P: "Speaker Amp.9" Speaker.2 | length 458
  Top Layer w10: Speaker.2 2678.46,3887.46 2678.46,3913.46 2784.53,4019.53 3063,4019.53
TIMER_EN: "Bat Management.9" MCU.22 | length 2054.8
  Top Layer w10: 2855.31,3535.38 2855.31,3546.14 2781.45,3620 2781.45,3695.95 2940.5,3855 3105,3855 3345,3615 v1(3345,3605) ; v1(4130,3475) 4215,3390 4255,3390 4316.22,3328.78 4316.22,3307.56 MCU.22
  Bottom Layer w10: v1(3345,3605) 4000,3605 v1(4130,3475)
TX: MCU.37 UART.2 | length 1174.9
  Top Layer w10: MCU.37@4604.49,3844.21 4615.28,3855 v1(4695,3855)
  Bottom Layer w10: v1@4695,3850 5365,3850 5487.56,3727.44 5487.56,3550.98 UART.2
USB: 4.7uf.2@2905,3322.09 10uf.1@2735,3030 270k.1 "Bat Management.4" "Bat Management.18" "Bat Management.19" DONE.1 LOWBAT.1 MICROUSB.1 NOBAT.1 | length 3588.8
  Top Layer w10: MICROUSB.1 2653.74,3121.26 ; NOBAT.1 DONE.1 LOWBAT.1 2630,2730 2805,2905 2805,3055 v1(2735,3125) ; 10uf.1@2735,3030 2727.13,3030 2713.43,3043.7 2713.43,3065.87 2659.3,3120 2655,3120 2653.74,3121.26 ; 2875,3384.62 2875,3344.21 4.7uf.2@2897.13,3322.09 ; 2894.68,3384.62 2894.68,3332.4 2905,3322.09 2920.67,3306.42 2938.58,3306.42 2960,3285 2960,3210 2875,3125 v1(2735,3125) ; 2950.38,3479.69 2950.67,3479.97 2961.43,3479.97 2982.82,3501.37 2982.82,3600.77 3017.05,3635 270k.1 v1(3025,3695) ; 2653.74,3121.26 2731.26,3121.26 v1(2735,3125)
  Bottom Layer w10: v1(2735,3125) 2724.18,3125 2704.18,3145 2645,3145 2460,3330 2460,3690 2585,3815 2915.82,3815 3025,3705.82 v1(3025,3695)
VERT: JOYSTICK.V2 MCU.17 | length 1240.9
  Top Layer w10: JOYSTICK.V2@3285,2500 3410,2500 3630,2720 3630,2895 3965,3230 4040,3230 4067.66,3257.66 4067.66,3283.57 MCU.17
pads on no net: "LIMIT SWITCH.1" "Speaker Amp.5" "Speaker Amp.6" "Speaker Amp.12" "Speaker Amp.13" "Volt Reg.11" "Volt Reg.12" "Volt Reg.13" "Volt Reg.14" "Volt Reg.15" JOYSTICK.B1B JOYSTICK.B2B MCU.10 MCU.11 MCU.12 MCU.13 MCU.14 MCU.15 MCU.16 MCU.19 MCU.23 MCU.24 MCU.25 MCU.26 MCU.28 MCU.29 MCU.32 MCU.33 MCU.34 MCU.35 MCU.38 MCU.39 MCU.41_10 MCU.41_11 MCU.41_12 MCU.41_13 MCU.41_14 MCU.41_15 MCU.41_16 MCU.41_17 MCU.41_18 MCU.41_19 MCU.41_20 MCU.41_21 MICROUSB.2 MICROUSB.3 MICROUSB.4 MICROUSB.6 MICROUSB.7 MICROUSB.8 MICROUSB.9 MICROUSB.10 MICROUSB.11 OLED. UART.

## Polygon pours and split planes (outlines as drawn)
GND on Top Layer "GND_L01_P000" (solid, remove dead copper, pour order 0): 2305,4395 2305,1835 5660,1835 5660,4395

## Silkscreen, mask and mechanical layers (free items; w line width, h text height)
Top Overlay:
  drawing of 47 lines, arcs and shapes, not listed
  text "SASHA ROTH 2026" at 4665,2060 h60
  text "FOR MY GUY CHRIS" at 4615,1935 h60
Bottom Overlay:
  drawing of 1400 lines, arcs and shapes, not listed

## Text inside footprints (layer, text, board x,y; h text height)
MCU: Mechanical 13 "ANTENNA" at 4076.77,4160.98 h50
"Speaker Amp": Mechanical 13 "*" at 3173.5,3975.63 h50 r180